# Altium PCB Power_Inverter_350VDC.PcbDoc (part 2 of 3)
Units mm, origin at the board's own origin, x right, y up, seen from the top; angles counter-clockwise.
Board outline 340.25 x 180.25 mm, 2 copper layers (Top Layer, Bottom Layer); 181 components, 76 nets, 433 pads, 298 vias.
Unrouted connection lines stored in the file: 1.
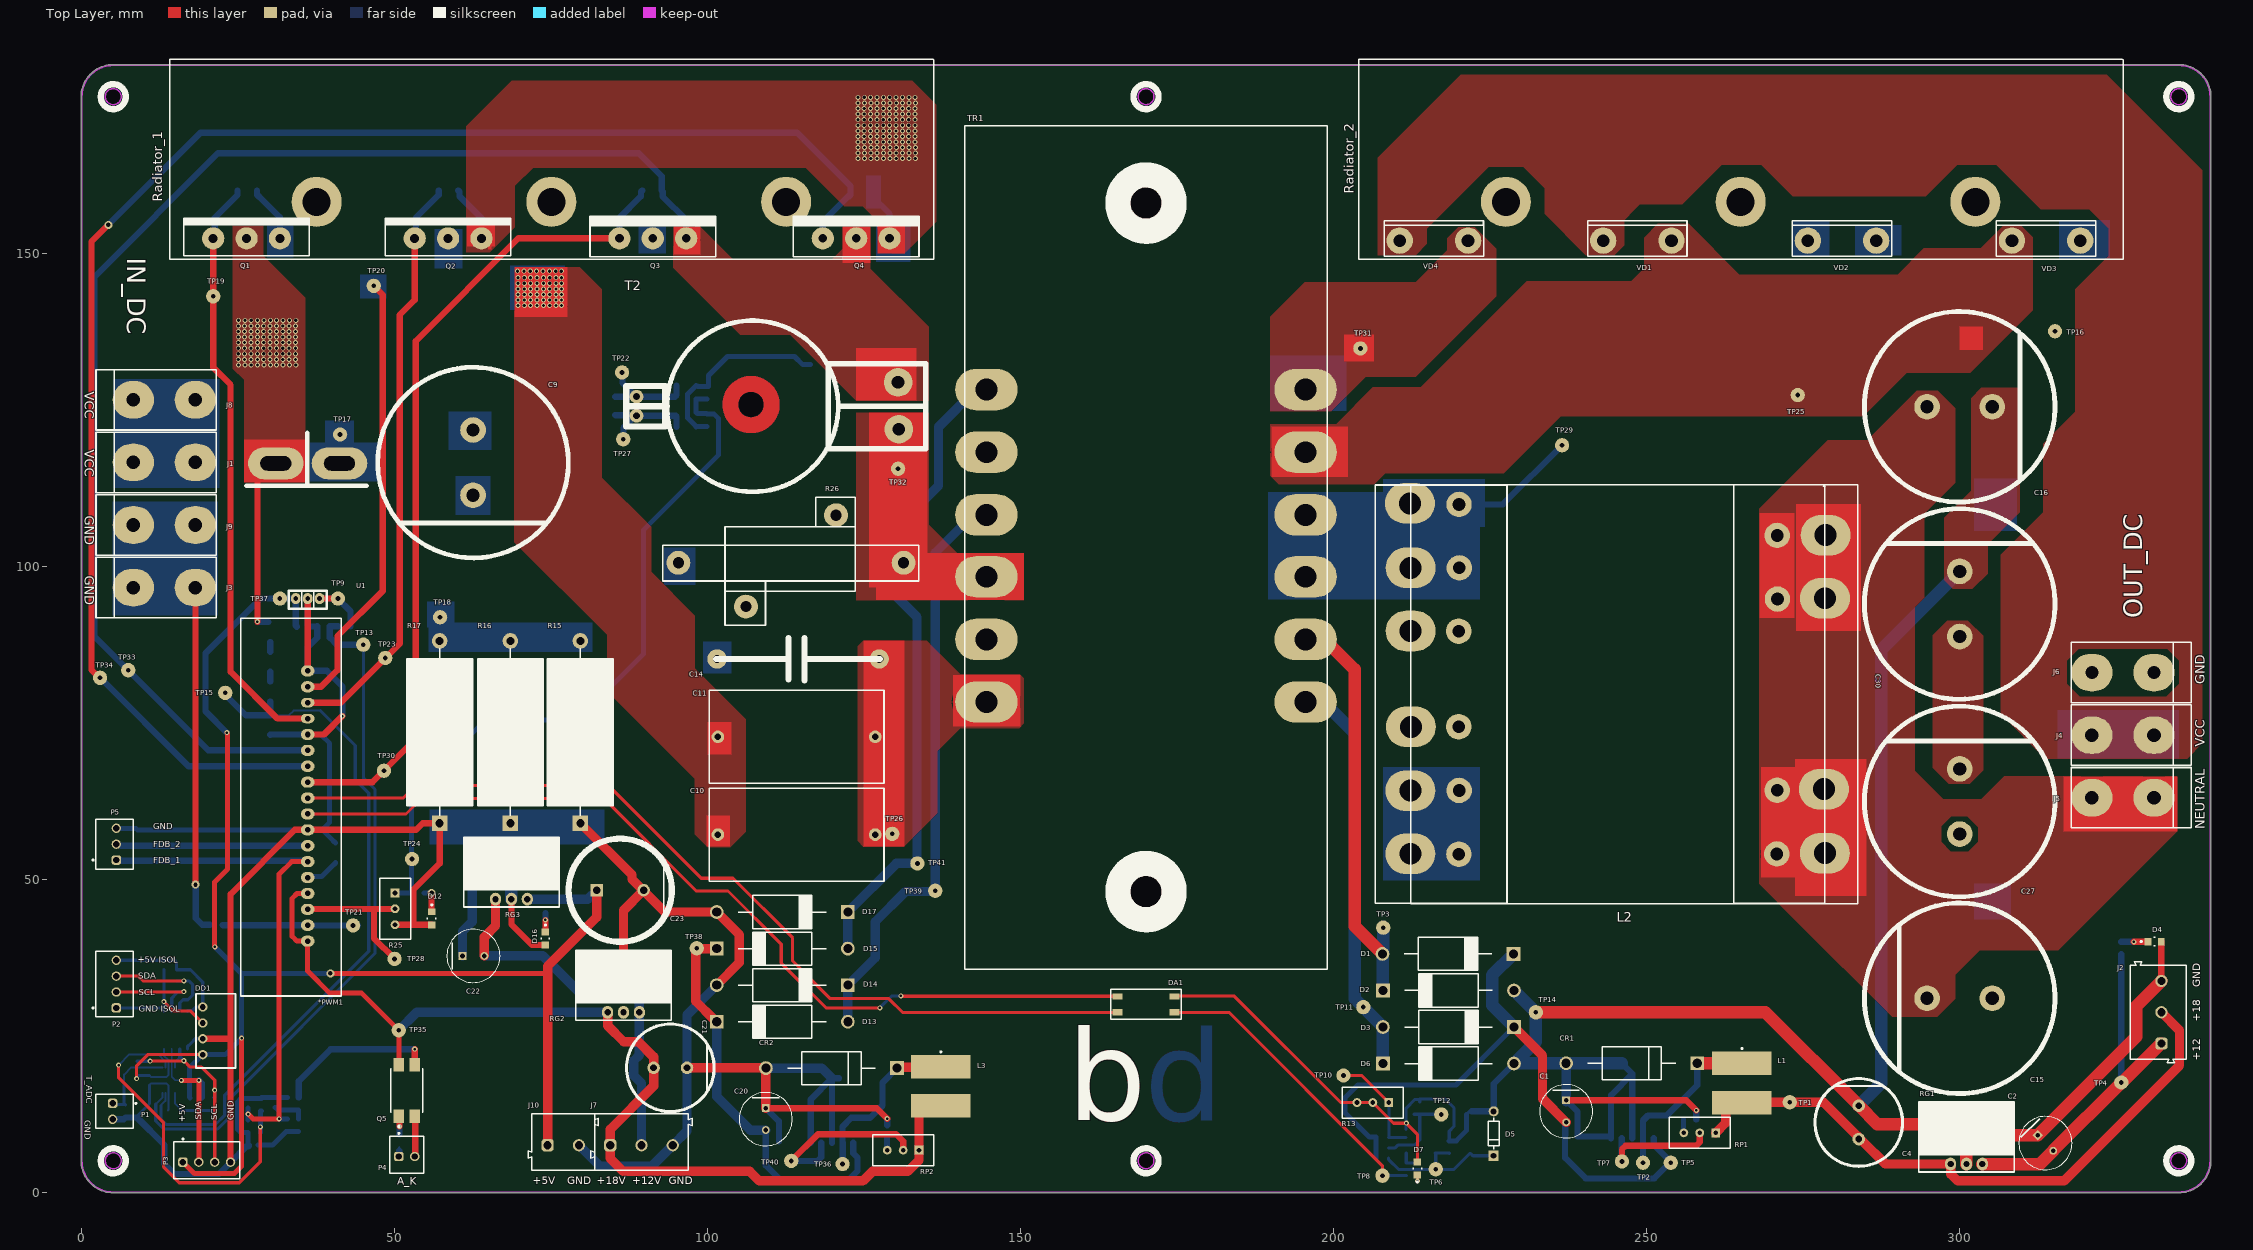
[diagram p0: Top Layer view]

## Via types
v1: diameter 0.8, hole 0.5, Top Layer to Bottom Layer, 266 vias
v2: diameter 0.8, hole 0.4, Top Layer to Bottom Layer, 28 vias
v3: diameter 1.27, hole 0.711, Top Layer to Bottom Layer, 4 vias

## Nets (pads, with @x,y where several pads share a name; then routed paths per layer and width w, separated by ;. In a path a pad name is that pad's centre, name@x,y a point inside that pad or via, vN(x,y) a via of type N, cw(c..) or ccw(c..) an arc to the next point about the centre after c; other vN are vias at no path point) (continued)
GND: (continued)
  other v1: 124,165.149 125.016,165.149 126.032,165.149 127.048,165.149 128.064,165.149 129.08,165.149 130.096,165.149 131.112,165.149 132.128,165.149 133.144,165.149 124,166.038 125.016,166.038 126.032,166.038 127.048,166.038 128.064,166.038 129.08,166.038 130.096,166.038 131.112,166.038 132.128,166.038 133.144,166.038 124.006,166.913 125.022,166.913 126.038,166.913 127.054,166.913 128.07,166.913 129.086,166.913 130.102,166.913 131.118,166.913 132.134,166.913 133.15,166.913 123.968,167.785 124.984,167.785 126,167.785 127.016,167.785 128.032,167.785 129.048,167.785 130.064,167.785 131.08,167.785 132.096,167.785 133.112,167.785 123.968,168.674 124.984,168.674 126,168.674 127.016,168.674 128.032,168.674 129.048,168.674 130.064,168.674 131.08,168.674 132.096,168.674 133.112,168.674 123.968,169.563 124.984,169.563 126,169.563 127.016,169.563 128.032,169.563 129.048,169.563 130.064,169.563 131.08,169.563 132.096,169.563 133.112,169.563 123.968,170.452 124.984,170.452 126,170.452 127.016,170.452 128.032,170.452 129.048,170.452 130.064,170.452 131.08,170.452 132.096,170.452 133.112,170.452 123.968,171.341 124.984,171.341 126,171.341 127.016,171.341 128.032,171.341 129.048,171.341 130.064,171.341 131.08,171.341 132.096,171.341 133.112,171.341 123.968,172.23 124.984,172.23 126,172.23 127.016,172.23 128.032,172.23 129.048,172.23 130.064,172.23 131.08,172.23 132.096,172.23 133.112,172.23 123.968,173.119 124.984,173.119 126,173.119 127.016,173.119 128.032,173.119 129.048,173.119 130.064,173.119 131.08,173.119 132.096,173.119 133.112,173.119 124.006,174.025 125.022,174.025 126.038,174.025 127.054,174.025 128.07,174.025 129.086,174.025 130.102,174.025 131.118,174.025 132.134,174.025 133.15,174.025 123.981,174.925 124.997,174.925 126.013,174.925 127.029,174.925 128.045,174.925 129.061,174.925 130.077,174.925 131.093,174.925 132.109,174.925 133.125,174.925